# Altium PCB SFY_ADA_4G_PCB.PcbDoc (part 2 of 2)
Units mm, origin at the board's own origin, x right, y up, seen from the top; angles counter-clockwise.
Board outline 69 x 58.5 mm, 4 copper layers (Top Layer, Layer 2, Layer 3, Bottom Layer), stack 1.74 mm thick; 131 components, 96 nets, 524 pads, 176 vias.
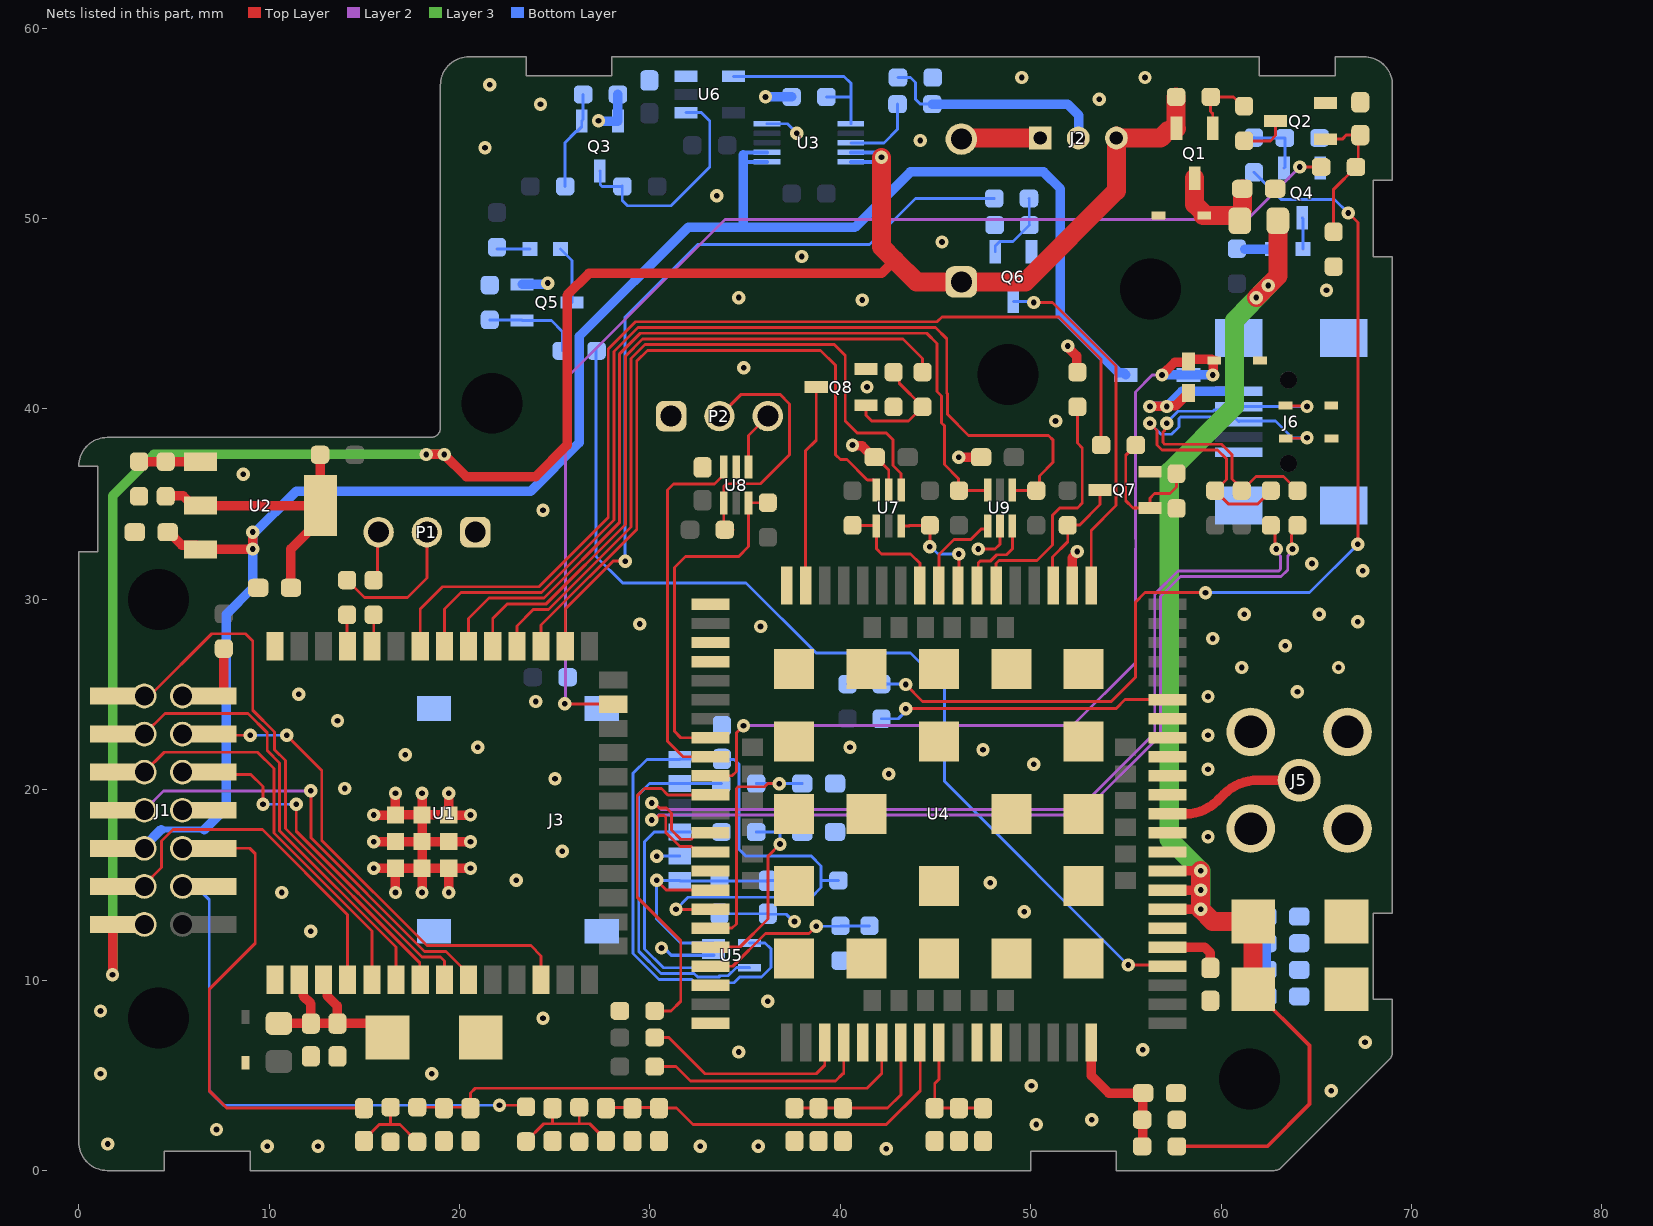
[diagram p4: the nets of this part, all layers, seen from the top]

## Via types
v1: diameter 0.7, hole 0.3, Top Layer to Bottom Layer, tented both sides, 176 vias

## Nets (pads, with @x,y where several pads share a name; then routed paths per layer and width w, separated by ;. In a path a pad name is that pad's centre, name@x,y a point inside that pad or via, vN(x,y) a via of type N, cw(c..) or ccw(c..) an arc to the next point about the centre after c; other vN are vias at no path point) (continued)
GND: C1.2 C2.1 C3.1 C4.1 C5.1 C7.2 C8.2 C9.2 C10.1 C11.2 C12.2 C13.1 C14.1 C15.1 C16.1 C17.2 C18.2 C19.1 C20.1 C21.2 C24.1 C25.1 C27.2 C28.2 C29.2 C33.1 C34.1 C35.1 C37.2 C38.2 C39.2 C42.2 C43.2 C44.2 C45.2 D1.1 D3.1 D6.1 D7.1 D8.1 J1.7 J1.M7 J2.1 J3.C5 J3.Shell J5.2 J5.3 J5.4 J5.5 J6.5 J6.Shell P1.1 P2.1 pad.4@46.355,54.169 Q2.2 Q3.2 Q4.2 Q5.2 Q6.2 Q7.2 Q8.2 R2.1 R5.1 R6.2 R14.2 R17.2 R23.2 R25.1 R26.1 R33.1 R39.2 R40.2 R42.1 R44.2 R48.2 R54.1 R60.2 R61.2 U1.1 U1.40 U1.41 U1.42 U1.43 U1.44 U1.45 U1.46 U1.47 U1.48 U1.49 U3.5 U4.2 U4.17 U4.18 U4.29 U4.39 U4.45 U4.46 U4.54 U4.58 U4.59 U4.61 U4.62 U4.63 U4.64 U4.65 U4.69 U4.70 U4.71 U4.72 U4.73 U4.74 U4.75 U4.76 U4.77 U4.78 U4.79 U4.80 U4.81 U4.82 U4.83 U4.84 U4.85 U4.86 U4.87 U4.88 U4.89 U4.91 U4.92 U4.94 U5.2 U6.3 U7.2 U8.2 U9.2 | length 54.8
  Top Layer w0.15: C43.2@41.872,37.465 42.545,36.792 U7.2@42.545,35.748 ; v1(47.244,32.639) 48.133,32.639 48.387,32.893 U9.2@48.387,33.848
  Top Layer w0.5: v1(15.494,15.875) U1.46@16.637,15.875 ; v1(15.494,17.272) U1.49@18.034,17.272 ; v1(15.494,18.669) U1.44@16.637,18.669 ; v1(16.637,14.605) U1.46@16.637,15.875 ; v1(16.637,19.812) U1.44@16.637,18.675 19.806,18.675 19.812,18.669 v1(20.574,18.669) ; v1(18.034,14.605) U1.47@18.034,15.875 ; v1(18.034,19.812) U1.49@18.034,17.272 ; v1(19.431,14.605) U1.48@19.431,15.875 ; U1.42@19.431,18.669 v1(19.431,19.812) ; v1(20.574,15.875) U1.48@19.431,15.875 ; v1(20.574,17.272) U1.49@18.034,17.272 ; v1(40.64,38.1) 40.678,38.062 41.15,38.062 41.747,37.465 C43.2@41.872,37.465 ; v1(46.228,37.465) C45.2@47.397,37.465 ; v1(51.943,43.307) 51.943,43.253 52.414,42.781 52.414,41.971 R54.1@52.451,41.934 ; U4.2@52.181,30.731 52.181,32.188 52.451,32.458 v1(52.451,32.512) ; U1.46@16.637,15.875 U1.47@18.034,15.875 ; U1.47@18.034,15.875 U1.47@18.037,15.875 U1.48@19.431,15.875 ; U1.47@18.034,15.875 U1.49@18.034,17.272
  Top Layer w1: pad.4@46.415,54.229 J2.1@50.5,54.229
  Bottom Layer w0.15: v1(30.353,16.51) J3.C5@31.565,16.51 ; C18.2@33.655,13.488 36.169,13.488 36.195,13.462 37.16,13.462 37.541,13.081 v1(37.592,13.081) ; U3.5@36.154,54.975 37.227,54.975 v1(37.719,54.483)
  Bottom Layer w0.2: v1(30.607,11.684) 30.742,11.684 31.123,11.303 U5.2@33.34,11.303
  Bottom Layer w0.5: Q5.2@23.288,46.543 24.518,46.543 24.584,46.609 v1(24.638,46.609) ; v1(27.301,55.138) 27.321,55.118 Q3.2@28.321,55.118 R14.2@28.321,56.515 ; v1(36.068,56.388) R6.2@37.441,56.388
  other v1: 42.418,1.143 9.906,1.27 12.573,1.27 32.639,1.27 35.687,1.27 1.524,1.397 7.239,2.159 50.292,2.413 53.213,2.667 65.786,4.191 50.038,4.445 1.143,5.08 18.542,5.08 34.671,6.223 55.88,6.35 67.564,6.731 24.384,8.001 1.143,8.382 36.195,8.89 12.192,12.573 49.657,13.589 10.668,14.605 47.879,15.113 22.987,15.24 25.4,16.764 59.309,17.526 13.97,20.066 25.019,20.574 42.545,20.828 59.309,21.082 50.165,21.336 17.145,21.844 47.498,22.098 20.955,22.225 40.513,22.225 59.309,22.86 13.589,23.622 24.003,24.638 59.309,24.892 11.557,25.019 64.008,25.146 61.087,26.416 66.167,26.416 63.373,27.559 59.563,27.94 35.814,28.575 29.464,28.702 67.183,28.829 61.214,29.21 65.151,29.21 67.437,31.496 64.77,31.877 24.384,34.671 8.636,36.576 51.308,39.37 41.402,41.148 34.925,42.164 41.148,45.72 34.671,45.847 65.532,46.228 37.973,48.006 45.339,48.768 33.51,51.192 21.336,53.721 44.196,54.102 24.257,56.007 53.594,56.261 21.59,57.023 49.53,57.404 56.007,57.404
MOD_STATUS: R32.1 U4.66 | length 15.5
  Top Layer w0.15: v1(43.434,24.257) 54.483,24.257 54.957,24.731 U4.66@57.181,24.731
  Bottom Layer w0.15: R32.1@42.164,23.725 43.047,23.725 43.434,24.112 v1(43.434,24.257)
MODEM_CTS: R55.1 U1.33 U9.4 | length 54.2
  Top Layer w0.15: U1.33@19.207,27.525 19.207,29.494 20.077,30.364 24.306,30.364 28.113,34.171 28.113,43.018 29.372,44.277 45.004,44.277 45.593,43.688 45.593,40.829 45.623,40.799 45.623,39.721 46.736,38.608 50.927,38.608 51.181,38.354 51.181,37.211 50.455,36.485 50.455,36.036 R55.1@50.211,35.792 ; U9.4@49.037,35.748 49.074,35.711 R55.1@50.292,35.711
MODEM_DTR: R43.1 U1.34 | length 54.7
  Top Layer w0.15: U1.34@17.937,27.525 17.937,29.494 19.107,30.664 24.181,30.664 27.813,34.296 27.813,42.969 27.813,43.142 29.248,44.577 29.421,44.577 45.085,44.577 45.339,44.831 51.486,44.831 53.697,42.62 R43.1@53.697,38.1
MODEM_EN_VBAT: R12.2 U1.25 | length 63.9
  Top Layer w0.15: v1(25.527,24.511) 28.056,24.511 U1.25@28.077,24.49 ; v1(64.135,52.705) R12.2@65.254,52.705
  Layer 2 w0.15: v1(25.527,24.511) 25.573,24.557 25.573,41.575 33.943,49.945 61.375,49.945 v1(64.135,52.705)
MODEM_PWRKEY: R37.1 U1.28 | length 40.9
  Top Layer w0.15: U1.28@25.557,27.525 25.557,29.494 28.067,32.004 v1(28.702,32.004)
  Bottom Layer w0.15: v1(28.702,32.004) 28.702,44.831 32.512,48.641 41.529,48.641 43.942,51.054 R37.1@48.085,51.054
MODEM_RESET: R45.1 U1.31 | length 36.4
  Top Layer w0.15: U1.31@21.747,27.525 21.747,28.986 22.525,29.764 24.554,29.764 28.713,33.923 28.713,42.429 28.713,42.77 29.62,43.677 29.961,43.677 43.293,43.677 44.323,42.647 R45.1@44.323,41.934
MODEM_RTS: U1.30 U7.1 | length 39
  Top Layer w0.15: U1.30@23.017,27.525 23.017,28.605 23.876,29.464 24.678,29.464 29.013,33.799 29.013,42.221 29.013,42.645 29.745,43.377 30.169,43.377 39.681,43.377 40.259,42.799 40.259,39.37 40.894,38.735 42.418,38.735 42.772,38.381 42.772,37.036 43.195,36.613 U7.1@43.195,35.748
MODEM_RXD: U1.29 U7.3 | length 35.9
  Top Layer w0.15: U1.29@24.287,27.525 24.287,28.648 29.313,33.674 29.313,42.521 29.869,43.077 38.965,43.077 39.751,42.291 39.751,37.592 40.005,37.338 40.355,37.338 41.42,36.273 41.77,36.273 41.895,36.148 U7.3@41.895,35.748
MODEM_TXD: R53.1 U1.32 U9.6 | length 47.4
  Top Layer w0.15: U1.32@20.477,27.525 20.477,28.986 21.555,30.064 24.43,30.064 28.413,34.047 28.413,42.637 28.413,42.894 29.496,43.977 29.753,43.977 44.542,43.977 45.085,43.434 45.085,40.912 45.323,40.674 45.323,39.259 45.466,39.116 45.466,37.084 46.214,36.336 46.214,35.725 R53.1@46.228,35.711 47.7,35.711 U9.6@47.737,35.748
NetC1_1: C1.1 C2.2 C3.2 FB1.2 U1.2 U1.3 | length 11.2
  Top Layer w0.5: FB1.2@10.516,7.727 12.192,7.727 13.364,7.727 15.477,7.727 C1.1@16.219,6.985 ; U1.2@11.587,10.025 11.787,9.825 11.787,9.168 12.192,8.763 C3.2@12.192,7.721 ; U1.3@12.857,10.025 13.057,9.825 13.057,9.168 13.579,8.646 13.579,7.731 C2.2@13.589,7.721
NetC5_2: C5.2 R1.2 R27.2 U2.2 U2.4 | length 16
  Top Layer w0.5: R1.2@4.572,35.409 4.596,35.433 5.492,35.433 6,34.925 U2.2@6.4,34.925 U2.4@12.7,34.925 ; C5.2@11.15,30.607 11.15,32.65 12.7,34.2 U2.4@12.7,34.925 ; R27.2@12.676,37.592 12.676,34.949 U2.4@12.7,34.925
NetC9_1: C9.1 Q2.1 R12.1 R61.1 | length 7.6
  Top Layer w0.15: Q2.1@65.485,54.168 66.36,54.168 66.574,54.382 C9.1@67.31,54.382 67.201,54.274 67.201,52.826 R12.1@67.08,52.705 65.913,51.538 R61.1@65.913,49.3
NetC10_2: C10.2 U4.53 | length 3.2
  Top Layer w0.5: U4.53@57.181,11.731 59.135,11.731 59.436,11.43 C10.2@59.436,10.642
NetC21_1: C21.1 J3.C7 R18.2 U4.31 U5.4 | length 47
  Top Layer w0.15: v1(31.369,13.716) 33.166,13.716 U4.31@33.181,13.731
  Bottom Layer w0.15: v1(31.369,13.716) 32.004,14.351 38.481,14.351 38.989,14.859 38.989,15.24 ; U5.4@35.24,11.953 36.053,11.953 36.361,11.645 36.361,10.655 35.865,10.16 34.717,10.16 34.417,9.86 32.388,9.86 32.215,10.033 30.48,10.033 29.118,11.395 29.118,20.863 29.845,21.59 J3.C7@31.565,21.59 31.591,21.616 C21.1@33.782,21.616 33.808,21.59 34.417,21.59 34.671,21.336 34.671,16.891 35.052,16.51 38.481,16.51 38.989,16.002 38.989,15.24 ; R18.2@39.902,15.24 38.989,15.24
NetC24_2: C24.2 C25.2 R28.2 U4.40 | length 27.3
  Top Layer w0.15: R28.2@17.78,3.326 19.177,3.326 C25.2@20.574,3.326 ; C25.2@20.574,3.276 20.574,4.064 20.828,4.318 41.402,4.318 42.181,5.097 U4.40@42.181,6.731
NetC26_2: C26.2 R26.2 R28.1 | length 4.5
  Top Layer w0.15: C26.2@14.986,1.55 14.986,1.612 15.787,2.413 16.327,2.413 ; R26.2@16.383,3.326 16.383,2.469 16.327,2.413 ; R28.1@17.78,1.5 16.867,2.413 16.327,2.413
NetC27_1: C27.1 C28.1 C29.1 U4.41 | length 8.6
  Top Layer w0.15: C27.1@37.592,3.276 C28.1@38.862,3.276 C29.1@40.132,3.276 42.475,3.276 43.18,3.98 U4.41@43.181,6.731 U4.41@43.181,6.731
NetC33_2: C33.2 C34.2 C36.1 U4.42 | length 20.2
  Top Layer w0.15: C36.1@27.686,3.276 27.712,3.302 29.083,3.302 C34.2@30.48,3.302 ; C34.2@30.48,3.276 31.395,3.276 32.258,2.413 42.418,2.413 44.196,4.191 44.196,6.716 U4.42@44.181,6.731
NetC35_2: C35.2 C36.2 R33.2 R34.1 | length 6.7
  Top Layer w0.15: R34.1@23.495,1.524 24.428,2.457 24.892,2.457 ; C35.2@24.892,3.276 24.892,2.457 ; R33.2@26.289,3.326 26.289,2.457 ; C36.2@27.686,1.55 27.686,1.612 26.841,2.457 26.289,2.457 ; 24.892,2.457 26.289,2.457
NetC37_1: C37.1 C38.1 C39.1 U4.43 | length 6.1
  Top Layer w0.15: U4.43@45.181,6.731 45.181,4.795 44.958,4.572 C37.1@44.958,3.276 C39.1@47.498,3.276
NetC42_1: C42.1 R38.1 R40.1 U4.51 | length 7.7
  Top Layer w0.5: U4.51@53.181,6.731 53.181,4.985 54.102,4.064 C42.1@55.906,4.064 55.881,4.039 55.881,1.295 R38.1@55.856,1.27
NetD4_1: D4.1 Q4.3 | length 1.7
  Bottom Layer w0.15: Q4.3@64.262,50.038 64.3,50 D4.1@64.3,48.4
NetD4_2: D4.2 R15.2 | length 1.5
  Bottom Layer w0.5: R15.2@61.238,48.387 61.244,48.393 62.693,48.393 D4.2@62.7,48.4
NetD5_1: D5.1 Q5.3 | length 3.1
  Bottom Layer w0.15: D5.1@25.3,48.4 25.908,47.792 Q5.3@25.908,45.593
NetD5_2: D5.2 R21.2 | length 1.7
  Bottom Layer w0.15: R21.2@21.971,48.403 23.697,48.403 D5.2@23.7,48.4
NetFB3_1: FB3.1 J6.1 | length 7.4
  Top Layer w0.5: v1(56.261,40.132) v1(57.15,40.132) 57.188,40.17 57.63,40.17 58.319,40.859 FB3.1@58.319,40.932
  Bottom Layer w0.5: v1(56.261,40.132) v1(57.15,40.132) 57.944,40.926 J6.1@60.934,40.926
NetJ1_13: J1.13 J1.M13 R29.2 | length 2.9
  Top Layer w0.5: J1.13@7.095,24.923 7.425,24.923 7.62,25.118 R29.2@7.62,27.408
NetJ2_2: J2.2 R4.2 R5.2 | length 11.9
  Bottom Layer w0.15: R5.2@43.029,57.404 43.688,57.404 43.942,57.15 43.942,56.261 44.196,56.007 R4.2@44.831,56.007
  Bottom Layer w0.5: R4.2@44.831,56.007 51.943,56.007 52.529,55.421 52.529,54.39 J2.2@52.569,54.35
NetJ3_C2: J3.C2 R19.2 U5.1 | length 13.9
  Bottom Layer w0.15: U5.1@33.34,10.653 30.709,10.653 29.718,11.644 29.718,17.272 30.226,17.78 J3.C2@31.565,17.78 R19.2@33.758,17.78
NetJ3_C3: J3.C3 R20.2 U5.5 | length 19.4
  Bottom Layer w0.15: 33.655,10.16 32.512,10.16 32.319,10.353 30.584,10.353 29.418,11.519 29.418,19.766 29.972,20.32 J3.C3@31.565,20.32 R20.2@33.758,20.32 ; 33.655,10.228 34.104,10.228 34.544,10.668 35.225,10.668 U5.5@35.24,10.653
NetJ5_1: J5.1 U4.60 | length 7.4
  Top Layer w0.5: U4.60@57.181,18.731 58.127,18.731 ccw(c58.127,21.121) 59.817,19.431 60.142,19.756 cw(c61.938,17.96) 61.938,20.5 J5.1@64.1,20.5
NetP1_2: P1.2 R8.2 | length 7.4
  Top Layer w0.15: R8.2@14.097,31.012 15.009,30.099 17.272,30.099 18.288,31.115 P1.2@18.288,33.528
NetP1_3: P1.3 R7.2 | length 2.6
  Top Layer w0.15: R7.2@15.494,31.012 15.702,31.22 15.702,33.482 P1.3@15.748,33.528
NetP2_2: P2.2 R52.1 U8.4 | length 13.8
  Top Layer w0.15: P2.2@33.655,39.624 34.798,40.767 36.83,40.767 37.338,40.259 37.338,37.592 35.814,36.068 34.036,36.068 33.879,35.911 U8.4@33.879,35.052 33.879,33.709 R52.1@33.933,33.655 ; R52.1@34.257,33.966 34.257,33.731 34.333,33.655 R52.1@34.371,33.655
NetP2_3: P2.3 U8.1 | length 3.1
  Top Layer w0.15: U8.1@35.179,36.952 35.179,38.608 P2.3@36.195,39.624
NetQ1_1: Q1.1 R10.1 R11.1 | length 3.7
  Top Layer w0.15: Q1.1@59.563,54.737 59.563,55.499 59.436,55.626 59.436,56.364 R10.1@59.46,56.388 60.655,56.388 61.139,55.904 R11.1@61.214,55.904
NetQ2_3: Q2.3 R11.2 | length 2.5
  Top Layer w0.15: R11.2@61.214,54.078 62.587,54.078 62.865,54.356 Q2.3@62.865,55.118
NetQ3_1: Q3.1 R13.2 R14.1 | length 5.2
  Bottom Layer w0.15: R13.2@25.551,51.689 25.551,53.999 26.135,54.583 26.186,54.583 26.421,54.818 Q3.1@26.421,55.118 26.495,55.192 R14.1@26.495,56.515
NetQ3_3: Q3.3 R9.2 U6.1 | length 12.1
  Bottom Layer w0.15: Q3.3@27.371,52.498 27.39,52.479 27.39,51.784 27.485,51.689 R9.2@28.551,51.689 ; R9.2@28.551,51.717 28.551,50.951 28.829,50.673 31.115,50.673 33.147,52.705 33.147,55.118 32.7,55.565 U6.1@31.897,55.565
NetQ4_1: Q4.1 R16.2 R17.1 | length 3.2
  Bottom Layer w0.15: R16.2@61.722,54.253 61.74,54.234 63.344,54.234 R17.1@63.349,54.229 63.349,52.695 Q4.1@63.312,52.658
NetQ5_1: Q5.1 R22.2 R23.1 | length 5.1
  Bottom Layer w0.15: R23.1@21.59,44.68 23.251,44.68 Q5.1@23.288,44.643 24.826,44.643 25.4,44.069 R22.2@25.4,43.055
NetQ6_1: Q6.1 R37.2 R39.1 | length 4
  Bottom Layer w0.15: Q6.1@48.138,48.26 48.138,48.56 48.373,48.795 49.073,48.795 R39.1@49.935,49.657 49.923,49.669 49.923,51.042 R37.2@49.911,51.054
NetQ6_3: Q6.3 U4.1 | length 19.2
  Top Layer w0.15: v1(50.165,45.593) 51.148,45.593 54.483,42.258 54.483,34.925 53.181,33.623 U4.1@53.181,30.731
  Bottom Layer w0.15: Q6.3@49.088,45.64 50.353,45.64 50.306,45.593 v1(50.165,45.593)
NetQ7_1: Q7.1 R43.2 R44.1 | length 7.4
  Top Layer w0.15: R43.2@55.523,38.1 54.991,37.568 54.991,35.179 55.372,34.798 Q7.1@56.261,34.798 56.261,35.306 56.511,35.556 57.319,35.556 57.658,35.895 R44.1@57.658,36.6
NetQ7_3: Q7.3 R41.1 U4.3 | length 6.4
  Top Layer w0.15: U4.3@51.181,30.731 51.15,30.763 51.15,32.227 51.943,33.02 R41.1@51.943,33.885 ; R41.1@51.943,33.909 52.578,33.909 53.641,34.972 Q7.3@53.641,35.748
NetQ8_1: Q8.1 R45.2 R48.1 | length 6.4
  Top Layer w0.15: Q8.1@41.355,40.198 41.355,39.671 41.656,39.37 43.585,39.37 R45.2@44.323,40.108 44.323,40.121 43.099,41.345 43.099,41.634 R48.1@42.799,41.934
NetQ8_3: Q8.3 U4.16 | length 10.6
  Top Layer w0.15: U4.16@38.181,30.731 38.181,37.8 38.735,38.354 Q8.3@38.735,41.148
NetR1_1: R1.1 R2.2 U2.1 | length 3.2
  Top Layer w0.5: R2.2@3.175,37.235 3.18,37.23 6.395,37.23 U2.1@6.4,37.225
NetR4_1: R4.1 U3.8 | length 4.1
  Bottom Layer w0.15: U3.8@40.554,53.975 42.291,53.975 43.005,54.689 R4.1@43.005,56.007
NetR6_1: R6.1 U3.6 U6.4 | length 9.7
  Bottom Layer w0.15: U6.4@34.397,57.465 40.198,57.465 40.554,57.109 40.554,56.388 ; R6.1@39.267,56.388 40.554,56.388 ; U3.6@40.554,54.975 40.554,56.388
NetR7_1: R7.1 U1.36 | length 1.7
  Top Layer w0.15: U1.36@15.397,27.525 15.494,27.622 R7.1@15.494,29.186
NetR8_1: R8.1 U1.37 | length 1.7
  Top Layer w0.15: R8.1@14.097,29.186 14.097,27.555 U1.37@14.127,27.525
NetR16_1: R16.1 R31.2 R32.2 | length 56.3
  Top Layer w0.15: v1(43.434,25.527) 44.323,24.638 54.229,24.638 55.499,25.908 55.499,29.845 56.007,30.353 v1(59.182,30.353) ; v1(66.675,50.292) 67.183,49.784 v1(67.183,32.893)
  Bottom Layer w0.15: R31.2@40.386,25.551 R32.2@42.164,25.551 43.41,25.551 v1(43.434,25.527) ; v1(59.182,30.353) 64.643,30.353 v1(67.183,32.893) ; R16.1@61.722,52.427 63.147,51.002 65.965,51.002 v1(66.675,50.292)
NetR22_1: R22.1 U4.52 | length 52.7
  Top Layer w0.15: v1(55.118,10.795) 57.117,10.795 U4.52@57.181,10.731
  Bottom Layer w0.15: R22.1@27.178,43.129 27.178,32.258 28.575,30.861 35.052,30.861 38.735,27.178 43.688,27.178 45.466,25.4 45.466,20.447 v1(55.118,10.795)
NetR42_2: R42.2 U4.25 | length 17.5
  Top Layer w0.15: R42.2@30.25,8.382 31.115,8.382 31.623,8.89 31.623,12.065 29.337,14.351 29.337,19.685 29.718,20.066 30.607,20.066 30.942,19.731 U4.25@33.181,19.731
NetR46_2: R46.2 U4.37 | length 11.1
  Top Layer w0.15: R46.2@30.25,6.985 30.988,6.985 32.893,5.08 38.735,5.08 39.181,5.526 U4.37@39.181,6.731
NetR47_2: R47.2 U4.38 | length 12
  Top Layer w0.15: R47.2@30.25,5.461 31.369,5.461 32.131,4.699 39.751,4.699 40.132,5.08 ccw(c40.132,5.129) 40.181,5.129 U4.38@40.181,6.731
NetR49_1: R49.1 U4.8 U7.6 | length 6
  Top Layer w0.15: U7.6@43.195,33.848 43.622,33.848 ; 43.622,33.885 R49.1@44.704,33.885 v1(44.704,32.766) ; U4.8@46.181,30.731 46.228,30.778 v1(46.228,32.385)
  Bottom Layer w0.15: v1(44.704,32.766) 44.755,32.766 45.136,32.385 v1(46.228,32.385)
NetR50_1: R50.1 U4.22 U8.6 | length 18.3
  Top Layer w0.15: U4.22@33.181,22.731 33.179,22.733 31.623,22.733 31.288,23.068 31.288,31.669 31.877,32.258 34.671,32.258 35.179,32.766 U8.6@35.179,35.052 35.203,35.076 R50.1@36.195,35.076
NetR51_1: R51.1 U4.10 U7.4 | length 6.2
  Top Layer w0.15: R51.1@40.64,33.885 41.858,33.885 U7.4@41.895,33.848 41.895,32.654 42.164,32.385 43.688,32.385 44.181,31.892 U4.10@44.181,30.731
NetR54_2: R54.2 U4.6 | length 13.1
  Top Layer w0.15: U4.6@48.181,30.731 48.181,31.882 48.338,32.039 50.327,32.039 51.142,32.854 51.142,34.417 51.523,34.798 52.451,34.798 52.705,35.052 52.705,37.952 52.451,38.206 R54.2@52.451,40.108
NetR56_2: R56.2 U4.27 | length 49.7
  Top Layer w0.15: v1(30.099,19.304) 30.226,19.304 30.49,19.04 30.871,19.04 31.136,18.775 31.136,17.886 31.623,17.399 32.168,17.399 32.256,17.487 32.256,17.506 32.481,17.731 U4.27@33.181,17.731 ; R56.2@62.611,33.885 62.611,33.785 62.839,33.557 62.839,32.704 v1(62.904,32.639)
  Layer 2 w0.15: v1(30.099,19.304) 30.242,19.304 30.577,18.969 52.497,18.969 56.515,22.987 56.515,30.269 57.742,31.496 63.031,31.496 63.119,31.584 63.119,32.276 62.904,32.491 v1(62.904,32.639)
NetR57_2: R57.2 U4.28 | length 49.8
  Top Layer w0.15: v1(30.099,18.415) 30.248,18.415 30.488,18.655 30.748,18.655 30.836,18.567 30.836,17.762 31.58,17.018 32.194,17.018 32.481,16.731 U4.28@33.181,16.731 ; v1(63.754,32.639) 63.698,32.695 63.698,33.385 63.708,33.396 63.708,33.573 R57.2@63.77,33.635
  Layer 2 w0.15: v1(30.099,18.415) 30.208,18.415 30.462,18.669 51.435,18.669 52.621,18.669 56.815,22.863 56.815,24.049 56.815,30.145 57.866,31.196 63.155,31.196 63.5,31.541 63.5,32.276 63.754,32.53 v1(63.754,32.639)
NetU4_7: U4.7 U9.3 | length 4.5
  Top Layer w0.15: U4.7@47.181,30.731 47.244,30.794 47.244,31.916 47.332,32.004 47.879,32.004 48.214,32.339 48.722,32.339 49.037,32.654 U9.3@49.037,33.848
NetU4_9: U4.9 U9.1 | length 4.8
  Top Layer w0.15: U4.9@45.181,30.731 45.181,32.354 45.974,33.147 46.856,33.147 47.4,33.691 47.612,33.691 47.737,33.816 U9.1@47.737,33.848
NetU4_23: U4.23 U8.3 | length 19.5
  Top Layer w0.15: U4.23@33.181,21.731 31.736,21.731 30.921,22.546 30.921,35.747 31.236,36.062 33.395,36.062 33.754,36.421 33.754,36.827 U8.3@33.879,36.952
SFY_CTS: J1.9 J1.M9 U1.8 | length 18.6
  Top Layer w0.15: J1.9@7.095,20.923 7.212,20.806 9.039,20.806 9.68,20.165 v1(9.68,19.237) ; v1(11.43,19.237) 11.43,17.82 18.039,11.211 18.996,11.211 19.207,11 U1.8@19.207,10.025
  Bottom Layer w0.15: v1(9.68,19.237) v1(11.43,19.237)
SFY_DTR: J1.4 J1.M4 U1.4 | length 19.5
  Top Layer w0.15: J1.4@1.795,14.923 2.858,14.923 J1.M4@3.151,15.216 ; J1.M4@3.445,14.923 3.445,15.01 4.351,15.916 4.351,17.305 4.953,17.907 9.646,17.907 14.127,13.426 U1.4@14.127,10.025
SFY_EAR+: C26.1 J1.5 J1.M5 | length 25.3
  Top Layer w0.15: J1.M5@6.001,16.923 J1.5@7.095,16.923 8.985,16.923 9.271,16.637 9.271,11.938 6.858,9.525 6.858,4.191 7.773,3.276 C26.1@14.986,3.276
SFY_EN_VBAT: J1.8 J1.M8 U1.9 | length 23.2
  Top Layer w0.15: v1(12.192,19.939) 12.192,17.483 18.164,11.511 19.291,11.511 20.477,10.325 U1.9@20.477,10.025
  Layer 2 w0.15: J1.M8@3.445,18.923 4.461,19.939 v1(12.192,19.939)
SFY_MIC+: J1.3 J1.M3 R34.2 | length 28.7
  Top Layer w0.15: v1(22.098,3.429) 23.416,3.429 R34.2@23.495,3.35
  Bottom Layer w0.15: J1.M3@5.445,14.923 5.518,14.85 6.232,14.85 6.858,14.224 6.858,4.191 7.62,3.429 v1(22.098,3.429)
SFY_RST_3V3: J1.11 J1.M11 U1.12 | length 25.4
  Top Layer w0.15: J1.11@7.095,22.923 7.158,22.86 v1(9.017,22.86) ; v1(10.922,22.86) 12.767,21.015 12.767,17.332 18.288,11.811 23.749,11.811 24.287,11.273 U1.12@24.287,10.025
  Bottom Layer w0.15: v1(9.017,22.86) v1(10.922,22.86)
SFY_RTS: J1.10 J1.M10 U1.5 | length 22.3
  Top Layer w0.15: J1.10@1.795,20.923 3.205,20.923 J1.M10@3.205,20.985 ; J1.M10@3.445,20.923 4.493,21.971 9.398,21.971 10.255,21.114 10.255,17.723 15.397,12.581 U1.5@15.397,10.025
SFY_RXD: J1.12 J1.M12 U1.6 | length 24.7
  Top Layer w0.15: J1.12@1.795,22.923 J1.M12@3.445,22.923 4.525,24.003 8.89,24.003 9.901,22.992 9.901,22.06 10.555,21.406 10.555,17.847 16.667,11.735 U1.6@16.667,10.025
SFY_TXD: J1.14 J1.M14 U1.7 | length 28.6
  Top Layer w0.15: J1.M14@3.445,24.923 3.721,24.923 6.992,28.194 8.763,28.194 9.144,27.813 9.144,24.173 10.287,23.03 10.287,22.098 10.855,21.53 10.855,17.971 17.914,10.912 17.914,10.048 U1.7@17.937,10.025
SIM_CLK: C20.2 R20.1 U4.32 | length 13.3
  Top Layer w0.15: U4.32@33.181,12.731 34.321,12.731 34.544,12.954 34.544,20.068 34.632,20.156 36.024,20.156 36.188,20.32 v1(36.792,20.32)
  Bottom Layer w0.15: R20.1@35.584,20.32 C20.2@37.999,20.32
SIM_DET: R24.2 R25.2 U4.34 | length 9.2
  Top Layer w0.15: U4.34@33.181,10.731 34.353,10.731 36.068,12.446 38.354,12.446 v1(38.735,12.827)
  Bottom Layer w0.15: v1(38.735,12.827) 39.981,12.827 R25.2@40.005,12.851 R24.2@41.529,12.851
SIM_RST: C19.2 R19.1 U4.33 | length 10.9
  Top Layer w0.15: U4.33@33.181,11.731 34.718,11.731 36.195,13.208 36.195,16.51 v1(36.83,17.145)
  Bottom Layer w0.15: R19.1@35.584,17.78 36.792,17.78 ; v1(36.83,17.145) 36.83,17.742 36.792,17.78 ; C19.2@37.999,17.78 36.792,17.78
SIM_VDD: C17.1 C18.1 J3.C1 R18.1 U4.30 U5.3 | length 16.3
  Top Layer w0.15: v1(30.353,15.24) 30.862,14.731 U4.30@33.181,14.731
  Bottom Layer w0.15: J3.C1@31.565,15.24 v1(30.353,15.24) 30.353,13.208 31.608,11.953 U5.3@33.34,11.953 ; J3.C1@31.578,15.227 31.591,15.214 C18.1@33.655,15.214 C17.1@36.195,15.214 36.221,15.24 R18.1@38.076,15.24
USB_DN: D7.2 J6.2 R57.1 R58.2 | length 19.6
  Top Layer w0.15: v1(57.15,39.243) 57.045,39.138 57.045,38.884 56.942,38.781 56.942,38.234 57.03,38.146 60.025,38.146 60.579,37.592 60.579,36.319 61.087,35.811 R58.2@61.087,35.711 61.825,36.449 63.27,36.449 R57.1@64.008,35.711 ; D7.2@63.387,40.167 63.404,40.15 64.498,40.15 v1(64.516,40.132)
  Layer 2 w0.15: v1@57.15,39.134 v1(57.15,39.243)
  Bottom Layer w0.15: v1(57.15,39.243) 57.15,39.294 57.734,39.878 59.563,39.878 59.636,39.951 60.759,39.951 J6.2@60.934,40.126 60.94,40.132 v1(64.516,40.132)
USB_DP: D6.2 J6.3 R56.1 R59.2 | length 21.5
  Top Layer w0.15: v1(56.261,39.243) 56.642,38.862 56.642,38.1 56.896,37.846 59.817,37.846 60.279,37.384 60.279,36.3 R59.2@59.69,35.711 ; R59.2@59.69,35.711 60.402,34.998 61.91,34.998 62.611,35.699 R56.1@62.611,35.711 ; D6.2@63.401,38.443 63.42,38.462 64.497,38.462 v1(64.516,38.481)
  Layer 2 w0.15: v1@56.261,39.134 v1(56.261,39.243)
  Bottom Layer w0.15: v1(56.261,39.243) 56.836,38.668 57.404,38.668 57.785,39.049 57.785,39.49 57.873,39.578 59.482,39.578 59.563,39.497 60.763,39.497 J6.3@60.934,39.326 ; J6.3@60.934,39.37 62.865,39.37 63.754,38.481 v1(64.516,38.481)
V_USB: D2.2 D8.2 FB3.2 U4.24 | length 48.4
  Top Layer w0.15: U4.24@33.181,20.731 34.32,20.731 34.544,20.955 34.544,22.989 v1(34.916,23.361)
  Top Layer w0.5: v1(56.896,41.783) 57.564,42.451 58.193,42.451 58.293,42.551 58.293,42.608 59.507,42.608 59.57,42.545 D8.2@59.64,42.545 ; v1@59.593,41.783 D8.2@59.593,42.363
  Layer 2 w0.15: v1(34.916,23.361) 34.923,23.368 52.197,23.368 55.499,26.67 55.499,32.665 55.515,32.681 55.515,33.157 55.499,33.173 55.499,40.894 56.388,41.783 v1(56.896,41.783)
  Bottom Layer w0.5: v1(56.896,41.783) v1(59.563,41.783)
VBAT: J1.2 J1.M2 J2.3 pad.4@46.355,46.669 Q1.2 R10.2 U3.9 U3.10 | length 111.7
  Top Layer w0.5: v1@1.795,10.304 J1.2@1.795,12.923 ; v1(18.252,37.608) v1@19.175,37.608 ; v1(19.192,37.61) 20.353,36.449 24.003,36.449 25.654,38.1 25.654,45.974 26.797,47.117 42.164,47.117 42.862,47.816
  Top Layer w1: v1(42.164,53.213) 42.164,48.514 42.862,47.816 44.009,46.669 pad.4@46.355,46.669 49.717,46.669 54.5,51.452 54.5,54.321 J2.3@54.554,54.267 ; J2.3@54.5,54.229 56.826,54.229 57.224,54.627 57.553,54.627 Q1.2@57.663,54.737 57.634,54.766 R10.2@57.634,56.388
  Layer 3 w0.5: v1(1.778,10.287) 1.778,35.433 3.953,37.608 v1(18.252,37.608) v1(19.192,37.61)
  Bottom Layer w0.2: U3.9@40.554,53.475 41.902,53.475 42.096,53.281 v1(42.164,53.213) 42.039,53.213 41.797,52.971 U3.10@40.558,52.971
VBAT_A: C8.1 D3.2 FB2.2 Q1.3 | length 6
  Top Layer w1: Q1.3@58.613,52.117 58.613,50.751 59.062,50.302 59.062,50.165 60.801,50.165 60.98,49.986 FB2.2@60.98,49.886 61.08,49.986 61.08,50.403 61.113,50.436 C8.1@61.113,51.562
VBAT_MOD: C11.1 C12.1 C13.2 C14.2 C15.2 C16.2 FB2.1 R38.2 U4.55 U4.56 U4.57 | length 76.9
  Top Layer w0.2: R38.2@57.682,1.27 62.421,1.27 64.647,3.496 64.647,6.563 C12.1@61.685,9.525
  Top Layer w0.5: U4.55@57.181,13.731 57.189,13.724 58.92,13.724 v1(58.928,13.716) ; U4.57@57.181,15.731 57.19,15.74 58.92,15.74 v1(58.928,15.748) ; U4.56@57.181,14.731 v1(58.928,14.732)
  Top Layer w1: v1(58.928,15.748) v1(58.928,14.732) v1(58.928,13.716) 59.563,13.081 C11.1@61.685,13.081 C12.1@61.685,9.525 ; v1(61.849,45.847) 62.98,46.978 FB2.1@62.98,49.886
  Layer 3 w1: v1(58.928,15.748) 57.277,17.399 57.277,36.703 60.706,40.132 60.706,44.638 v1(62.484,46.482) ; v1@58.936,13.724 58.936,14.74 v1@58.936,15.756
  Bottom Layer w0.5: v1(58.928,13.716) 58.982,13.716 59.363,13.335 C13.2@62.383,13.335 C14.2@62.383,11.938 C16.2@62.383,9.144
VEXT_4.5V: C4.2 D2.1 J1.6 J1.M6 U2.3 U3.1 U3.2 | length 97.5
  Top Layer w0.5: C4.2@4.673,33.528 4.735,33.528 5.413,32.85 6.175,32.85 U2.3@6.4,32.625 6.407,32.632 v1@9.137,32.632 ; v1@9.137,33.532 v1@9.137,32.632 ; v1(9.144,32.639) v1@9.137,32.632
  Bottom Layer w0.2: 34.909,53.358 35.026,53.475 U3.2@36.154,53.475 ; 35.026,52.975 U3.1@36.154,52.975
  Bottom Layer w0.3: 4.33,17.907 6.604,17.907
  Bottom Layer w0.5: J1.M6@3.445,16.923 3.445,17.022 4.33,17.907 ; 6.604,17.907 7.747,19.05 7.747,29.21 9.144,30.607 v1(9.144,32.639) 9.144,33.401 11.43,35.687 23.749,35.687 26.289,38.227 26.289,43.815 32.004,49.53 34.909,49.53 ; 34.909,53.358 34.909,49.53 ; D2.1@54.992,41.783 54.867,41.908 54.612,41.908 51.562,44.958 51.562,51.562 50.673,52.451 43.688,52.451 40.767,49.53 34.909,49.53
  other v1: 9.148,33.532
pads on no net: J3.C6 J6.4 J6.MH1 J6.MH2 U1.10 U1.11 U1.15 U1.16 U1.17 U1.18 U1.19 U1.20 U1.21 U1.22 U1.23 U1.24 U1.35 U3.3 U4.4 U4.5 U4.11 U4.12 U4.13 U4.14 U4.19 U4.20 U4.21 U4.26 U4.35 U4.36 U4.44 U4.47 U4.48 U4.49 U4.50 U4.67 U4.68 U4.90 U4.93 U4.95 U4.96 U4.97 U4.98 U4.99 U4.100 U4.101 U4.102 U4.103 U4.104 U4.105 U4.106 U4.107 U4.108 U4.109 U4.110 U4.111 U4.112 U4.113 U4.114 U4.115 U4.116 U4.117 U4.118 U4.119 U4.120 U4.121 U4.122 U4.123 U4.124

## Polygon pours and split planes (outlines as drawn)
+3.3V on Layer 3 "NONET_L02_P-001" (solid, remove dead copper, pour order 2): 35.941,57.023 36.576,56.388 36.576,53.086 28.575,45.085 28.575,38.862 30.226,37.211 48.26,37.211 51.816,40.767 51.816,50.419 52.959,51.562 60.706,51.562 62,50.268 62,43.204 58.547,39.751 56.388,39.751 52.324,35.687 52.324,33.401 50.546,31.623 20.955,31.623 15.621,26.289 15.621,5.842 13.081,3.302 8.382,3.302 6.35,5.334 6.35,10.414 10.16,14.224 10.16,24.13 5.842,28.448 5.842,34.925 9.144,38.227 23.622,38.227 25.273,39.878 25.273,53.721 28.575,57.023
GND on Layer 3 "GND_L3" (solid, remove dead copper, pour order 5): 0,0 68.961,0 68.961,58.547 19.05,58.547 19.05,38.481 0,38.481
GND on Layer 2 "GND_L2" (solid, remove dead copper, pour order 4): 0,0 68.961,0 68.961,58.547 19.05,58.547 19.05,38.481 0,38.481
+1.8V on Layer 2 "NONET_L02_P-001" (solid, remove dead copper, pour order 1): 51.816,38.354 52.705,37.465 52.705,35.179 52.07,34.544 42.418,34.544 40.386,32.512 40.386,28.448 39.624,27.686 28.575,27.686 27.305,26.416 27.305,10.695 29.237,8.763 37.747,8.763 41.162,12.178 42.822,12.178 43.815,11.185 43.815,9.652 38.608,4.445 26.67,4.445 23.622,7.493 23.622,29.718 28.067,34.163 35.687,34.163 39.878,38.354
GND on Bottom Layer "GND_BOT" (solid, remove dead copper, pour order 0): 0,0 68.961,0 68.961,58.547 19.05,58.547 19.05,38.481 0,38.481
GND on Top Layer "GND_TOP" (solid, remove dead copper, pour order 3): 0,0 68.961,0 68.961,58.547 19.05,58.547 19.05,38.481 0,38.481

## Keep-outs
Keep-Out Layer:
  circle w0.254: c61.5,4.8 r2.62
  circle w0.254: c21.7,40.3 r2.62
  circle w0.254: c48.8,41.8 r2.62
  circle w0.254: c4.191,3.81 r1.75
  circle w0.254: c56.3,46.3 r3.293
  lines w0.1: 68.854,5.851 ccw(c68.5,6.205) 69,6.205 69,9 68,9 68,13.5 69,13.5 69,48 68,48 68,52 69,52 69,57 ccw(c67.5,57) 67.5,58.5 ; 68.853,5.852 63.148,0.146 cw(c62.794,0.5) 62.794,0 54.5,0 54.5,1 50,1 50,0 9,0 9,1 4.5,1 4.5,0 1.5,0 cw(c1.5,1.5) 0,1.5 0,32.5 1,32.5 1,37 0,37 cw(c1.5,37) 1.5,38.5 18.5,38.5 ccw(c18.5,39) 19,39 19,57 cw(c20.5,57) 20.5,58.5 23.5,58.5 23.5,57.5 28,57.5 28,58.5 62,58.5 62,57.5 66,57.5 66,58.5 ; 66,58.5 67.5,58.5 ; 66,58.5 67.5,58.5

## Silkscreen, mask and mechanical layers (free items; w line width, h text height)
Top Overlay:
  text "4G GSM MODULE" at 22.606,52.324 h1.52
  text "RSP" at 30.861,49.276 h1.52
  text "+" at 43.942,45.847 h1.52
  text "LTE_LOG" at 28.829,44.069 h1.52
  text "G T R" at 30.099,41.529 h1.52
  text "E" at 60.144,39.189 h1
  text "M" at 65.986,36.522 h1
  text "R T G" at 14.859,35.306 h1.52
  text "ESP_PROG" at 18.415,29.972 h1.52
Bottom Overlay:
  lines w0.254: 15.7,9.85 45.3,9.85 45.3,27 15.7,27 15.7,9.85
  text "BOOT" at 22.877,25.507 h0.8
  text "M E" at 42.599,21.663 h1
Mechanical 1:
  lines w0.1: 17.78,38.481 68.974,38.428 ; 19.304,49.53 68.199,49.53

## Dimensions
67.5,58.5 to 62.794,0 on Mechanical 1
0,32.5 to 69,13.5 on Mechanical 1